# EAGLE board cutout (EAGLE 9.6.2)
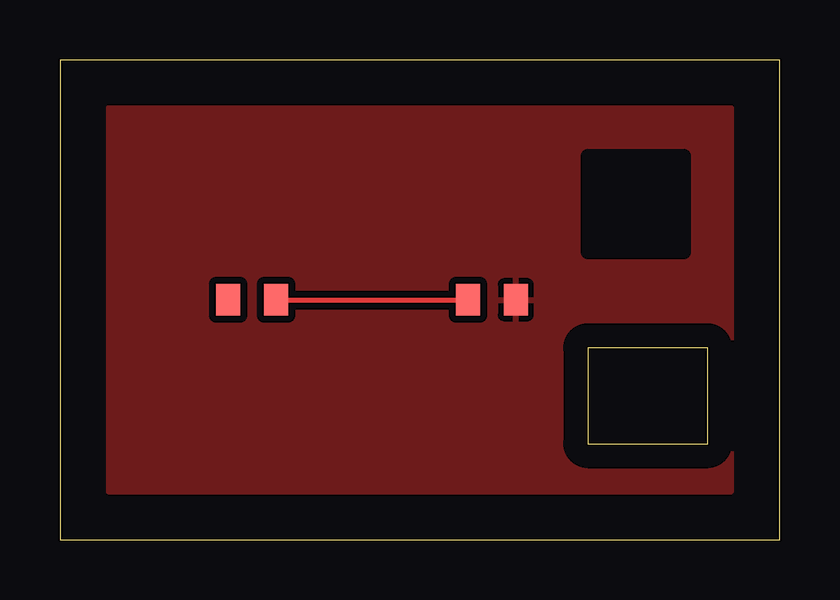
[diagram p0: board, top side]

Size 30 x 20 mm. Coordinates in mm from the lower left corner, seen from the top.
Outline: 0,0 30,0 30,20 0,20 0,0
Outline: 22,4 27,4 27,8 22,8 22,4
Copper layers used: Top
layer 41: area 22,12 to 26,16

## Footprints (pad centres in the part's own frame; a part is rotated, then mirrored left to right if it is on the bottom)
R0805 = smd 1 x 1.3: 1 -1,0; 2 1,0

## Placement (x,y rotation side)
R1  10k  [R0805]  8,10 0 top
R2  4k7  [R0805]  18,10 0 top

## Library data of the parts
R1 R2 = guide

## Nets
GND: R2.2
MID: R1.2 R2.1

## Tracks (layer width: path | path; a pad name or v marks a point on that pad's centre or on a via)
GND
  pour Top (isolate 0.3): 2,2 28,2 28,18 2,18
MID
  Top 0.2: R1.2 R2.1